# Altium PCB EMG-Arm-ELEC-V1.0.PcbDoc (part 2 of 5)
Units mil, origin at the board's own origin, x right, y up, seen from the top; angles counter-clockwise.
Board outline 8303.83 x 7532.25 mil, 2 copper layers (Top Layer, Bottom Layer), stack 3.556 mil thick; 303 components, 183 nets, 804 pads, 233 vias.
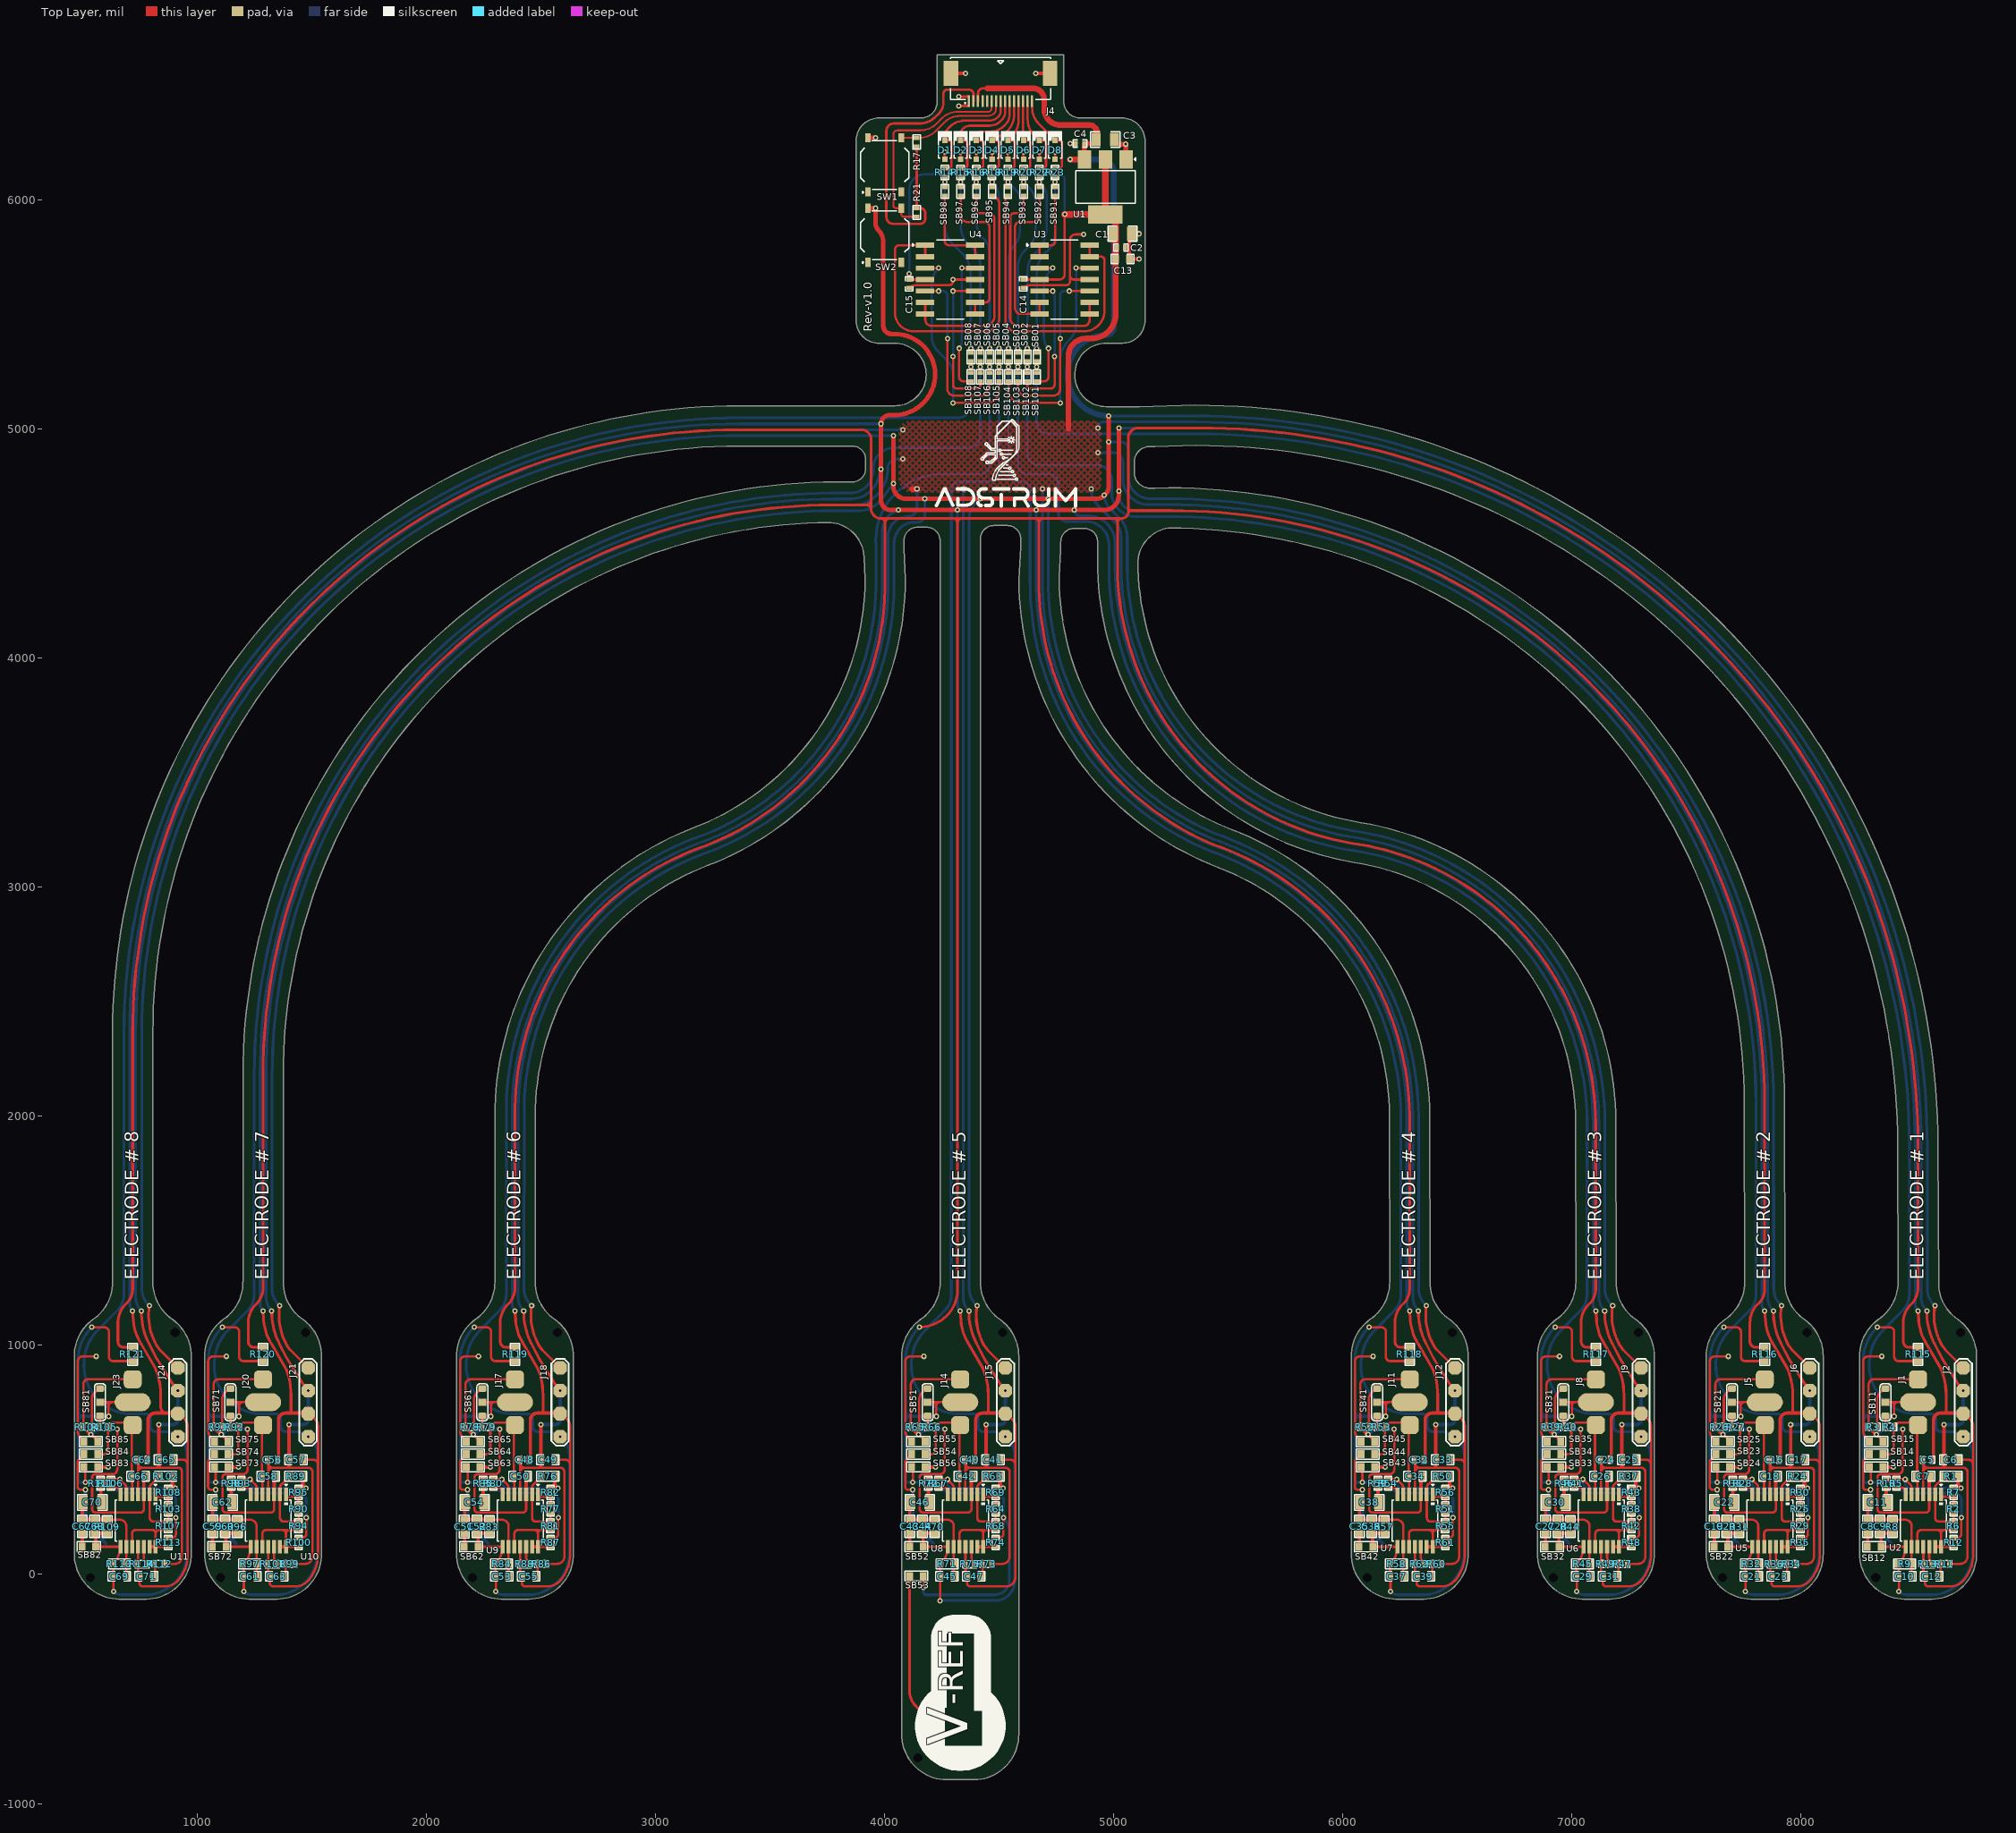
[diagram p0: Top Layer view]

## Part data (continued)
R3 R4 R26 R27 R39 R40 R52 R53 R65 R66 R78 R79 R91 R92 R104 R105: library part RC0402FR-071ML, "RES 1M OHM 1% 1/16W 0402", Case Code (Imperial)=0402, Case Code (Metric)=1005, LCSC Part Number=C138033, Manufacturer=Yageo, Max Operating Temperature=155°C, Max Power Dissipation=63mW, Min Operating Temperature=-55°C, Resistance Tolerance=1%, Resistor Type="Thick Film", Supplier Part Number=311-1.00MLRCT-ND, Temperature Coefficient=100ppm/°C, Voltage Rating=50V, Case/Package=0402, Category="Chip SMD Resistors", ComponentLink1Description=https://datasheet.ciiva.com/11808/0900766b80c66297-11808125.pdf?src-supplier=Rs, ComponentLink1URL=https://datasheet.ciiva.com/11808/0900766b80c66297-11808125.pdf?src-supplier=Rs, ComponentLink2Description=https://datasheet.ciiva.com/46394/1018594-46394951.pdf?src-supplier=Element14, ComponentLink2URL=https://datasheet.ciiva.com/46394/1018594-46394951.pdf?src-supplier=Element14, ComponentLink3Description=https://datasheet.ciiva.com/7849/1018594-7849883.pdf?src-supplier=Element14, ComponentLink3URL=https://datasheet.ciiva.com/7849/1018594-7849883.pdf?src-supplier=Element14, ComponentLink4Description=https://datasheet.ciiva.com/7849/1018594-7849882.pdf?src-supplier=Element14, ComponentLink4URL=https://datasheet.ciiva.com/7849/1018594-7849882.pdf?src-supplier=Element14, ComponentLink5Description=https://datasheet.ciiva.com/16741/pyu-rc0402-51-rohs-l-6-r-16741081.pdf?src-supplier=Future+Electronics, ComponentLink5URL=https://datasheet.ciiva.com/16741/pyu-rc0402-51-rohs-l-6-r-16741081.pdf?src-supplier=Future+Electronics, Construction=Rectangular, Depth=0.5mm, Features="Moisture Resistant", Height=0.32mm, Item Type=Resistor, Lead Free=5697LeadFree, Length=1mm, Manufacturer Part Number=RC0402FR-071ML, Military Standard=Not, Number of Terminations=2, Packaging="Tape and Reel", Power Rating=63mW, Pricing="1=0.1, 10=0.015, 50=0.0088, 100=0.0073, 500=0.00488, 1000=0.00417, 5000=0.00297 (USD)", Reach SVHC Compliant=Unknown, RoHS=Yes, RoHS Compliant=Yes, Series=RC, Stock=6516, Supplier=Digikey, Technology="THICK FILM", Termination=SMD/SMT, Tolerance=1%, Voltage Rating (AC)=50V
R5 R6 R11 R13 R17 R21 R28 R29 R34 R36 R41 R42 R47 R49 R54 R55 R60 R62 R67 R68 R73 R75 R80 R81 R86 R88 R93 R94 R99 R101 R106 R107 R112 R114: library part RC0402FR-0710KL, "RES 10K OHM 1% 1/16W 0402", Case Code (Imperial)=0402, Case Code (Metric)=1005, LCSC Part Number=C60490, Manufacturer=Yageo, Max Operating Temperature=155°C, Max Power Dissipation=63mW, Min Operating Temperature=-55°C, Power Rating=62.5mW, Resistance=10kR, Resistance Tolerance=1%, Resistor Type="Thick Film", Supplier Part Number 1=603-RC0402FR-0710KL, Temperature Coefficient=100ppm/°C, Voltage Rating=50V, Case/Package=0402, Category="Chip SMD Resistors", ComponentLink1Description=https://datasheet.ciiva.com/7660/38568-7660787.pdf?src-supplier=Element14, ComponentLink1URL=https://datasheet.ciiva.com/7660/38568-7660787.pdf?src-supplier=Element14, ComponentLink2Description=https://datasheet.ciiva.com/7849/1686128-7849814.pdf?src-supplier=Element14, ComponentLink2URL=https://datasheet.ciiva.com/7849/1686128-7849814.pdf?src-supplier=Element14, ComponentLink3Description=https://datasheet.ciiva.com/7983/1018594-7983486.pdf?src-supplier=Element14, ComponentLink3URL=https://datasheet.ciiva.com/7983/1018594-7983486.pdf?src-supplier=Element14, ComponentLink4Description=https://datasheet.ciiva.com/22747/1018594-22747512.pdf?src-supplier=Element14, ComponentLink4URL=https://datasheet.ciiva.com/22747/1018594-22747512.pdf?src-supplier=Element14, ComponentLink5Description=https://datasheet.ciiva.com/12667/pyu-rc0402-51-rohs-l-6-r-12667067.pdf?src-supplier=Mouser, ComponentLink5URL=https://datasheet.ciiva.com/12667/pyu-rc0402-51-rohs-l-6-r-12667067.pdf?src-supplier=Mouser, ComponentLink6Description=https://datasheet.ciiva.com/7849/1784430-7849813.pdf?src-supplier=Element14, ComponentLink6URL=https://datasheet.ciiva.com/7849/1784430-7849813.pdf?src-supplier=Element14, ComponentLink7Description=https://datasheet.ciiva.com/7849/1784430-7849815.pdf?src-supplier=Element14, ComponentLink7URL=https://datasheet.ciiva.com/7849/1784430-7849815.pdf?src-supplier=Element14, Construction=Rectangular, Depth=0.5mm, Features="Moisture Resistant", Height=0.32mm, Lead Free="Lead Free", Lead Pitch=0.2mm, Length=1mm, Manufacturer Part Number=RC0402FR-0710KL, Military Standard=Not, Number of Pins=2, Number of Terminations=2, Packaging="Tape and Reel", Pricing 1="1=0.10000, 10=0.01400, 50=0.01400, 100=0.00500, 1000=0.00300, 10000=0.00200 (USD)", REACH SVHC="No SVHC", RoHS=Yes, RoHS Compliant=Yes, Series=RC, Stock 1=18648329, Supplier 1=Mouser, Termination=SMD/SMT, Tolerance=1%, Voltage Rating (DC)=50V, Width=0.5mm, Working Voltage=50V
  R5 R6 R11 R13 R28 R29 R34 R36 R41 R42 R47 R49 R54 R55 R60 R62 R67 R68 R73 R75 R80 R81 R86 R88 R93 R94 R99 R101 R106 R107 R112 R114: Item Type=Resistor
R8 R31 R44 R57 R70 R83 R96 R109: library part RC0603FR-071ML, "RES SMD 1M OHM 1% 1/10W 0603", Case Code (Imperial)=0603, Case Code (Metric)=1608, LCSC Part Number=C105578, Manufacturer=Yageo, Max Operating Temperature=155°C, Min Operating Temperature=-55°C, Package Quantity=5000, Power Rating=100mW, Resistance=1MR, Supplier Part Number 1=311-1.00MHRDKR-ND, Temperature Coefficient=100ppm/°C, Tolerance=1%, Voltage Rating=50V, Case/Package=0603, ComponentLink1Description=http://www.farnell.com/datasheets/2167052.pdf?src-supplier=Mouser, ComponentLink1URL=http://www.farnell.com/datasheets/2167052.pdf?src-supplier=Mouser, ComponentLink2Description=http://www.farnell.com/datasheets/2167052.pdf?src-supplier=Element14, ComponentLink2URL=http://www.farnell.com/datasheets/2167052.pdf?src-supplier=Element14, ComponentLink3Description=http://documents.rs-components.com/techlib://itc_doclist_GB.htm?stockno=5048956&src-supplier=RSComponents, ComponentLink3URL=http://documents.rs-components.com/techlib://itc_doclist_GB.htm?stockno=5048956&src-supplier=RSComponents, Composition="Thick Film", Depth=0.8mm, Height=0.45mm, Item Type=Resistor, Lead Free="Lead Free", Length=1.6mm, Manufacturer Part Number=RC0603FR-071ML, Military Standard=Not, Number of Pins=2, Packaging="Tape and Reel", Pricing 1="1=0.1, 10=0.023, 100=0.0094, 1000=0.00421, 2500=0.00366 (USD)", REACH SVHC="No SVHC", Stock 1=3824601, Supplier 1=Digi-Key, Termination=SMD/SMT, Voltage Rating (DC)=50V, Width=0.8mm
R115 R116 R117 R118 R119 R120 R121: library part RC0603JR-070RL, "RES 0 OHM JUMPER 1/10W 0603", Case Code (Imperial)=0603, Case Code (Metric)=1608, LCSC Part Number=C95177, Manufacturer=Yageo, Max Operating Temperature=155°C, Max Power Dissipation=100mW, Min Operating Temperature=-55°C, Package Quantity=5000, Resistance=0mR, Resistance Tolerance=5%, Resistor Type="Thick Film", Supplier Part Number 1=311-0.0GRCT-ND, Temperature Coefficient=200ppm/°C, Tolerance=1%, Voltage Rating=50V, Case/Package=0603, Category="Chip SMD Resistors", Construction=Rectangular, Contact Plating=Tin,Matte, Depth=0.8mm, Features="Moisture Resistant", Height=0.45mm, Item Type=Resistor, Lead Free="Lead Free", Length=1.6mm, Manufacturer Part Number=RC0603JR-070RL, Military Standard=Not, Number of Pins=2, Number of Terminations=2, Packaging="Tape and Reel", Power Rating=100mW, Pricing 1="1=0.10000, 10=0.01700, 25=0.01240, 50=0.00960, 100=0.00700, 250=0.00536, 500=0.00430, 1000=0.00316 (USD)", Radiation Hardening=No, Reach SVHC Compliant="No SVHC", RoHS=Yes, RoHS Compliant=Yes, Series=RC, Size Code=0603, Stock 1=18081776, Supplier 1=Digi-Key, Technology="THICK FILM", Termination=SMD/SMT, Voltage Rating (DC)=50V, Width=0.8mm
SB01 SB02 SB03 SB04 SB05 SB06 SB07 SB08 SB91 SB92 SB93 SB94 SB95 SB96 SB97 SB98 SB101 SB102 SB103 SB104 SB105 SB106 SB107 SB108: "Solder Bridge ON", Item Type="Solder Bridge", Manufacturer Part Number="Solder Bridge 0402"
SB11 SB12 SB13 SB14 SB15 SB21 SB22 SB23 SB24 SB25 SB31 SB32 SB33 SB34 SB35 SB41 SB42 SB43 SB44 SB45 SB51 SB52 SB53 SB54 SB55 SB56 SB61 SB62 SB63 SB64 SB65 SB71 SB72 SB73 SB74 SB75 SB81 SB82 SB83 SB84 SB85: "Solder Bridge ON", Manufacturer Part Number="Solder Bridge", Item Type="Solder Bridge"
SW1 SW2: "No Gull Wing 50mA 100MΩ 80000 260gf@±50gf 12V -25℃~+85℃ 1.7mm Golden Round Button Brick nogging SPST SMD Tactile Switches ROHS", LCSC Part Number=C2845290, Manufacturer=HCTL, ComponentLink1Description=LCSC, ComponentLink1URL=https://www.lcsc.com/product-detail/Tactile-Switches_HCTL-TC-0522C-1-7-260G_C2845290.html, Item Type=Switch, Manufacturer Part Number=TC-0522C-1.7-260G
U1: "IC REG LINEAR 5V 1A SOT-223-4", LCSC Part Number=C5845194, Manufacturer="Texas Instruments", Item Type=IC, Manufacturer Part Number=TLV76150DCYR, Pricing="1=0.5, 10=0.314, 50=0.314, 100=0.253, 1000=0.231, 10000=0.167 (USD)", RoHS=No, Stock=32246, Supplier=Mouser
U2 U5 U6 U7 U8 U9 U10 U11: "IC OPAMP JFET 4 CIRCUIT 14TSSOP", Case/Package=71Case, LCSC Part Number=C4370424, Manufacturer="Texas Instruments", Height=1.2mm, Item Type=IC, Length=5mm, Manufacturer Part Number=TL074HIPWR, Pins=14NUMBER, Pricing="1=0.26, 10=0.156, 50=0.156, 100=0.117, 1000=0.112, 10000=0.101 (USD)", RoHS=No, Stock=67959, Supplier=Mouser, Thickness=1mm, Width=4.4mm
U3 U4: "IC OPAMP GP 1.3MHZ 14SO", Case/Package=SO, Dual Supply Voltage=12V, Input Bias Current=150nA, Input Offset Voltage (Vos)=7mV, Input Voltage Noise Density="40nV/sqrt Hz", LCSC Part Number=C71035, Manufacturer=STMicroelectronics, Max Dual Supply Voltage=15V, Max Operating Temperature=70°C, Max Power Dissipation=400mW, Max Supply Voltage=30V, Min Dual Supply Voltage=1.5V, Min Operating Temperature=0°C, Min Supply Voltage=3V, Nominal Supply Current=1.2mA, Output Current=40mA, Package Quantity=2500, Voltage Gain=100dB, Bandwidth=1.3MHz, Common Mode Rejection Ratio=70dB, ComponentLink1Description=https://datasheet.ciiva.com/4758/cd00000457-103203-4758032.pdf?src-supplier=Mouser, ComponentLink1URL=https://datasheet.ciiva.com/4758/cd00000457-103203-4758032.pdf?src-supplier=Mouser, ComponentLink2Description=https://datasheet.ciiva.com/8008/1834360-8008827.pdf?src-supplier=Element14, ComponentLink2URL=https://datasheet.ciiva.com/8008/1834360-8008827.pdf?src-supplier=Element14, ComponentLink3Description=https://datasheet.ciiva.com/8008/1834360-8008490.pdf?src-supplier=Element14, ComponentLink3URL=https://datasheet.ciiva.com/8008/1834360-8008490.pdf?src-supplier=Element14, ComponentLink4Description=https://datasheet.ciiva.com/28630/1834360-28630538.pdf?src-supplier=Element14, ComponentLink4URL=https://datasheet.ciiva.com/28630/1834360-28630538.pdf?src-supplier=Element14, ComponentLink5Description=https://datasheet.ciiva.com/1795/cd00000457-1795560.pdf?src-supplier=Digi-Key, ComponentLink5URL=https://datasheet.ciiva.com/1795/cd00000457-1795560.pdf?src-supplier=Digi-Key, ComponentLink6Description=https://datasheet.ciiva.com/1795/cd00000457-1795559.pdf?src-supplier=Digi-Key, ComponentLink6URL=https://datasheet.ciiva.com/1795/cd00000457-1795559.pdf?src-supplier=Digi-Key, ComponentLink7Description=https://datasheet.ciiva.com/1795/cd00000457-1795561.pdf?src-supplier=Digi-Key, ComponentLink7URL=https://datasheet.ciiva.com/1795/cd00000457-1795561.pdf?src-supplier=Digi-Key, ComponentLink8Description=https://datasheet.ciiva.com/16375/cd00000457-16375528.pdf?src-supplier=Future+Electronics, ComponentLink8URL=https://datasheet.ciiva.com/16375/cd00000457-16375528.pdf?src-supplier=Future+Electronics, Contact Plating=Tin,Matte, Gain Bandwidth Product=1.3MHz, Height=1.65mm, Item Type=IC, Lead Free="Lead Free", Manufacturer Part Number=LM324DT, Mount="Surface Mount", Number of Amplifiers=4, Number of Channels=4, Number of Circuits=4, Number of Elements=4, Number of Pins=14, Operating Supply Current=1.2mA, Operating Supply Voltage=15V, Output Current per Channel=40mA, Packaging="Cut Tape", Pricing 1="2500=0.18900 (USD)", Radiation Hardening=No, REACH SVHC="No SVHC", RoHS=Yes, RoHS Compliant=Yes, Series=LM324, Slew Rate=0.4V/µs, Stock 1=287500, Supplier 1="Arrow Electronics", Supplier Part Number 1=LM324DT, Supply Type=Single,Dual, Technology=BIPOLAR, Unity Gain Bandwidth Product=1.3MHz, Weight=0.009143oz, Width=4mm

## Free pads (board coordinates)
  round 0 hole 39.37 unplated: MH1(534.62,-13.05) MH1(1103.59,-13.05) MH1(2203.38,-13.05) MH1(4146.86,-801.46) MH1(6109.03,-13.05) MH1(6921.74,-13.06) MH1(7658.49,-13.05) MH1(8327.96,-13.05) MH2(905.11,1056.22) MH2(1474.08,1056.22) MH2(2573.87,1056.22) MH2(4517.35,1056.22) MH2(6479.52,1056.22) MH2(7292.23,1056.21) MH2(8028.98,1056.22) MH2(8698.45,1056.22)

## Via types
v1: diameter 23.62, hole 11.81, Top Layer to Bottom Layer, tented both sides, 233 vias